# EAGLE board MOSFET IRLZ44N (EAGLE 9.7.0)

Size 145.67 x 270.74 mm. Coordinates in mm from the lower left corner, seen from the top.
Outline: 0,0 145.67,0 145.67,270.74 0,270.74 0,0
Copper layers (1*16): Top 0.035mm / dielectric 1.5mm / Bottom 0.035mm
Design rules "default": minimum track width 6mil, minimum drill 0.35mm, track to track 6mil, track to pad 6mil, pad to pad 6mil, via to via 6mil, smd to smd 6mil, copper to edge 40mil, drill to drill 6mil, minimum pad ring 10mil, minimum via ring 8mil, stop-mask expansion 4mil, vias tented up to drill 0mil, thermal gap 10mil

## Footprints (pad centres in the part's own frame; a part is rotated, then mirrored left to right if it is on the bottom)
BATTERY-GENERIC = drill 1.118 pad 3.15 octagon: + 2.54,0; - -2.54,0
DIODE-AXIAL = drill 1: 1 -5.08,0; 2 5.08,0
MOTOR = drill 1.118 pad 3.15 octagon: + 2.54,0; - -2.54,0
RESAD1016W63L850D250B = drill 0.83 pad 1.43: 1 -5.08,0; 2 5.08,0
SWITCH-SPDT-PTH-8.5X3.7MM = drill 1.016 pad 1.88: 1 -2.54,0; 2 0,0; 3 2.54,0
TO220BV = drill 1.016 long: D 0,-2.54; G -2.54,-2.54; S 2.54,-2.54

## Placement (x,y rotation side)
BAT5  6V  [BATTERY-GENERIC]  8.26,60.89 90 top
BATBATTERY  6V  [BATTERY-GENERIC]  8.3,243.79 90 top
D1  DIODEDIODE-AXIAL  [DIODE-AXIAL]  124.24,245.51 0 top
D2  DIODEDIODE-AXIAL  [DIODE-AXIAL]  133.94,61.68 0 top
M1  MOTOR_HDR  [MOTOR]  126.72,262.49 0 top
M2  MOTOR_HDR  [MOTOR]  134.15,89.66 0 top
P1  BATTERYGENERIC  [BATTERY-GENERIC]  137.41,8.26 0 top
PPOWER_SUPPLY  BATTERYGENERIC  [BATTERY-GENERIC]  128.23,193.53 0 top
R1  1k  [RESAD1016W63L850D250B]  60.54,204.35 270 top
R2  1k  [RESAD1016W63L850D250B]  49.31,245.58 0 top
R3  1k  [RESAD1016W63L850D250B]  59.21,62.4 0 top
R4  1k  [RESAD1016W63L850D250B]  66.19,30.85 90 top
S1  TOGGLE  [SWITCH-SPDT-PTH-8.5X3.7MM]  32.01,241.28 180 top
S2  TOGGLE  [SWITCH-SPDT-PTH-8.5X3.7MM]  38.93,58.73 180 top
T2  NMOSFET  [TO220BV]  76.65,231.32 0 top
T4  NMOSFET  [TO220BV]  82.97,56.2 0 top

## Library data of the parts
BAT5 BATBATTERY D1 D2 M1 M2 P1 PPOWER_SUPPLY R1-R4 S1 S2 = Tinkercad
T2 T4 = Tinkercad; CATEGORY: Transistor; SUB-CATEGORY: MOSFET; TYPE: N-Channel

## Nets
BAT5+: BAT5.+ S2.2
BATBATTERY+: BATBATTERY.+ S1.2
M1_-: D1.1 M1.- T2.D
M2_+: D2.1 M2.+ T4.D
P1+: D2.2 M2.- P1.+
P1-: BAT5.- P1.- R4.1 T4.S
PPOWER_SUPPLY+: D1.2 M1.+ PPOWER_SUPPLY.+
PPOWER_SUPPLY-: BATBATTERY.- PPOWER_SUPPLY.- R1.2 T2.S
S1_O: R2.1 S1.1
S2_O: R3.1 S2.1
T2_G: R1.1 R2.2 T2.G
T4_G: R3.2 R4.2 T4.G

## Tracks (layer width: path | path; a pad name or v marks a point on that pad's centre or on a via)
BAT5+  (1 unrouted)
BATBATTERY+  (1 unrouted)
M1_-  (2 unrouted)
M2_+  (2 unrouted)
P1+  (2 unrouted)
P1-  (3 unrouted)
PPOWER_SUPPLY+  (2 unrouted)
PPOWER_SUPPLY-  (3 unrouted)
S1_O  (1 unrouted)
S2_O  (1 unrouted)
T2_G  (2 unrouted)
T4_G  (2 unrouted)